# Altium PCB pyBehaviorLab_breakout_board.PcbDoc (part 2 of 4)
Units mm, origin at the board's own origin, x right, y up, seen from the top; angles counter-clockwise.
Board outline 190.01 x 159.89 mm, 2 copper layers (Top Layer, Bottom Layer); 146 components, 148 nets, 758 pads, 634 vias.
Unrouted connection lines stored in the file: 29.
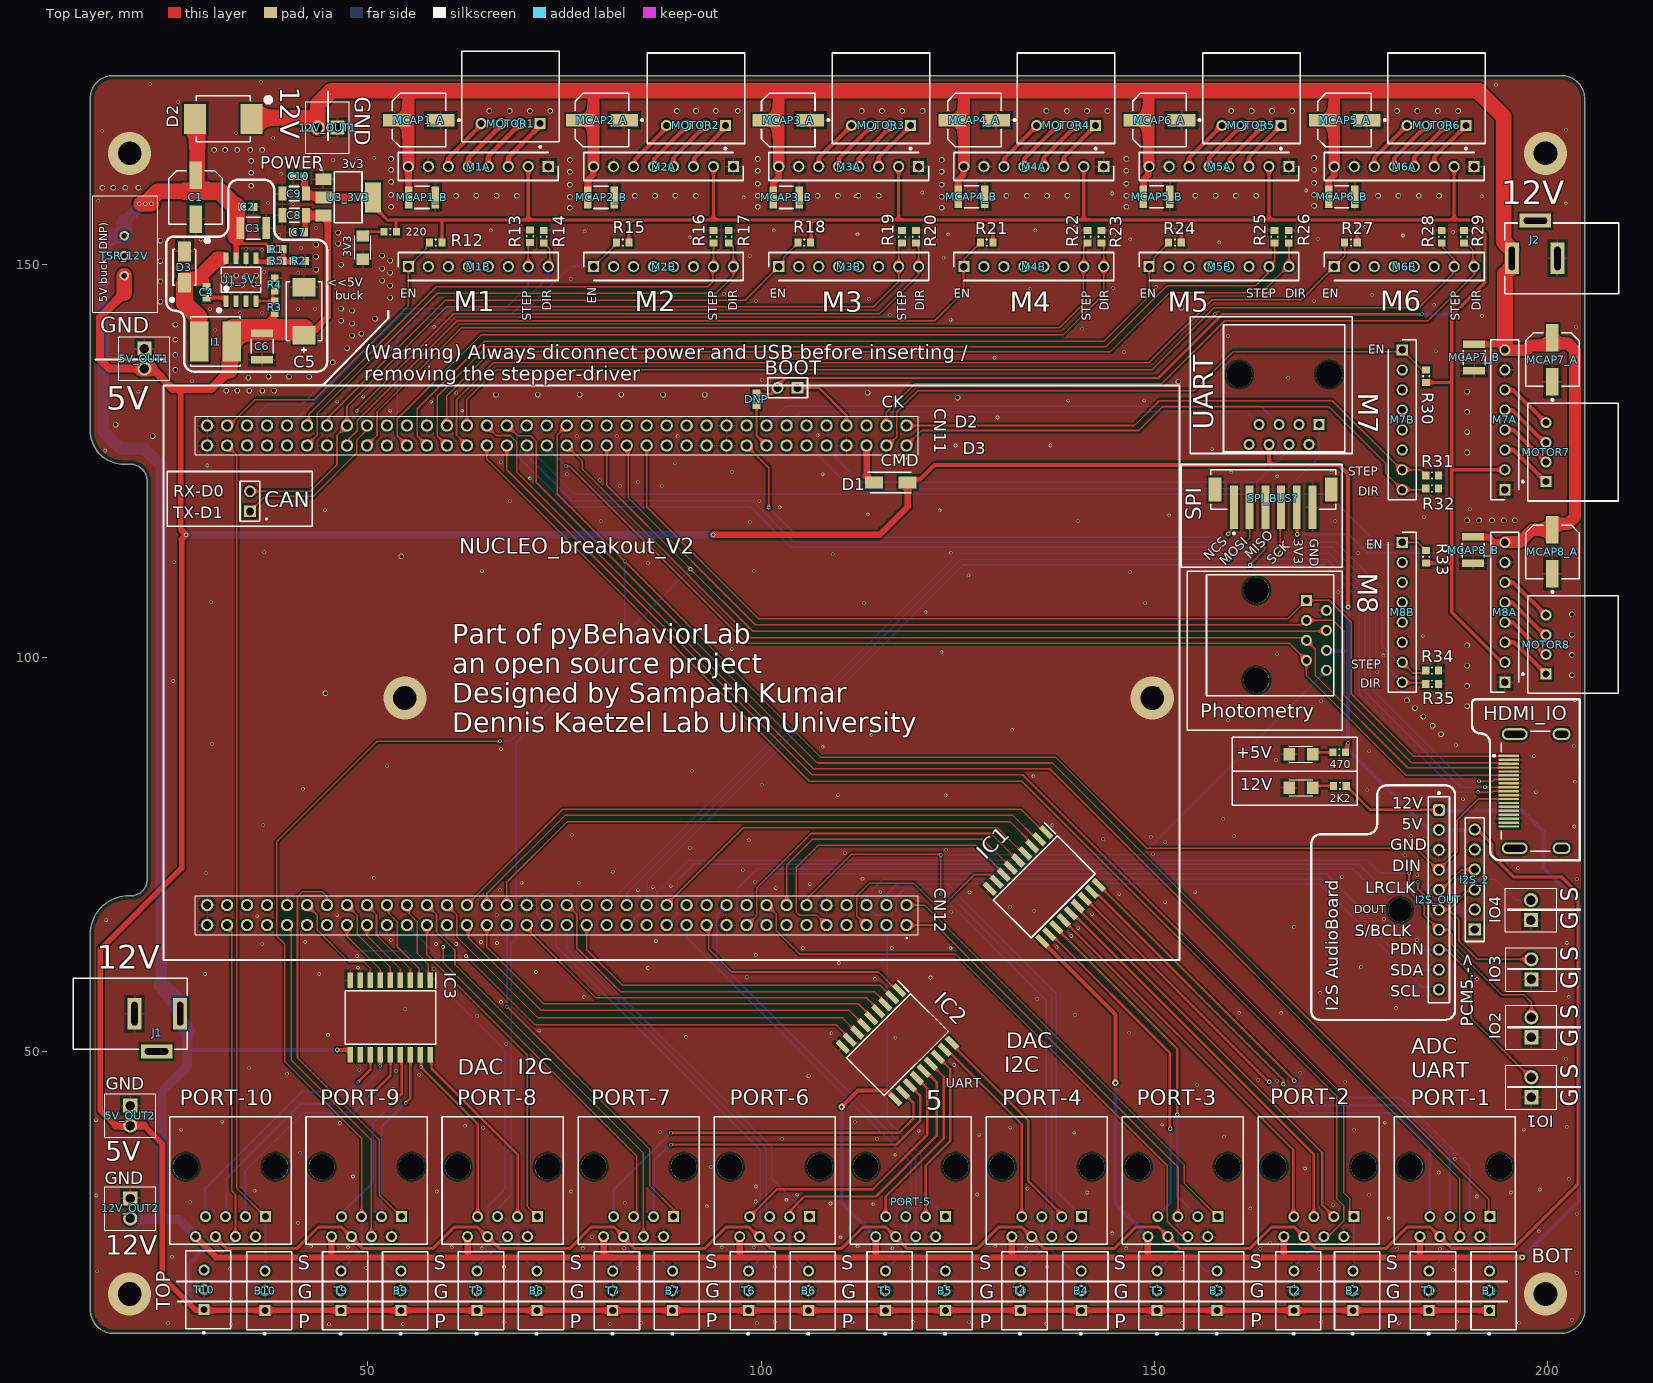
[diagram p0: Top Layer view]

## Via types
v1: diameter 0.45, hole 0.3, Top Layer to Bottom Layer, tented both sides, 413 vias
v2: diameter 0.7, hole 0.5, Top Layer to Bottom Layer, tented bottom, 173 vias
v3: diameter 0.6, hole 0.3, Top Layer to Bottom Layer, tented both sides, 12 vias
v4: diameter 0.5, hole 0.3, Top Layer to Bottom Layer, tented both sides, 10 vias
v5: diameter 0.5, hole 0.35, Top Layer to Bottom Layer, tented both sides, 7 vias
v6: diameter 5.5, hole 3, Top Layer to Bottom Layer, tented bottom, 6 vias
v7: diameter 0.6, hole 0.305, Top Layer to Bottom Layer, tented both sides, 6 vias
v8: diameter 0.8, hole 0.4, Top Layer to Bottom Layer, tented both sides, 2 vias
v9: diameter 0.45, hole 0.305, Top Layer to Bottom Layer, tented both sides, 2 vias
v10: diameter 0.7, hole 0.3, Top Layer to Bottom Layer, tented both sides, 1 vias
v11: diameter 0.4, hole 0.3, Top Layer to Bottom Layer, tented both sides, 1 vias
v12: diameter 3, hole 3, Top Layer to Bottom Layer, tented both sides, 1 vias

## Nets (pads, with @x,y where several pads share a name; then routed paths per layer and width w, separated by ;. In a path a pad name is that pad's centre, name@x,y a point inside that pad or via, vN(x,y) a via of type N, cw(c..) or ccw(c..) an arc to the next point about the centre after c; other vN are vias at no path point) (continued)
+12V: (continued)
  Bottom Layer w0.5: 27.305,50.128 v3@46.064,50.128 ; v8(110.236,42.926) 110.236,30.759 PORT-5.8@114.572,26.423 ; v8(145.034,45.974) 145.034,30.55 PORT-3.8@149.161,26.423 ; I2S_OUT.1@186.164,80.68 186.232,80.611 196.757,80.611 199.449,77.919 199.449,73.32 203.95,68.819 203.95,30.992 v10(196.742,23.784)
  Bottom Layer w1: 12V_OUT2.2@19.794,28.737 12V_OUT2.2@19.925,28.605 ; 23.802,28.747 23.944,28.605 ; J1.1@25.744,56.351 25.744,55.172 J1.1@26.144,54.772 J1.1@26.144,53.672
  Bottom Layer w1.2: 12V_OUT2.2@19.925,28.605 23.944,28.605 25.991,28.605 PORT-10.8@28.136,26.46 ; 23.802,28.747 23.802,44.806 27.068,48.073 27.068,52.747
  Bottom Layer w1.5: 17.807,153.67 16.375,152.238 16.375,128.769 18.536,126.608 21.609,126.608 23.731,124.485 23.731,58.364 ; 19.05,155.448 20.955,157.353 v3(20.955,157.734)
  Bottom Layer w2: 17.807,153.67 TSR_12V.1@19.05,153.67 19.05,155.448 ; v3@21.209,157.734 v3(21.717,157.734) v3@21.844,157.734 ; 23.731,58.364 J1.1@25.744,56.351 ; J1.1@26.144,53.672 27.068,52.747
+12V_motor: 12V_OUT1.2 D2.1 J2.1 M1A.8 M2A.8 M3A.8 M4A.8 M5A.8 M6A.8 M7A.8 M8A.8 MCAP1_A.2 MCAP1_B.1 MCAP2_A.2 MCAP2_B.1 MCAP3_A.2 MCAP3_B.1 MCAP4_A.2 MCAP4_B.1 MCAP5_A.2 MCAP5_B.1 MCAP6_A.2 MCAP6_B.1 MCAP7_A.2 MCAP7_B.1 MCAP8_A.2 MCAP8_B.1 | length 328.7
  Top Layer w0.8: MCAP1_B.1@55.158,157.895 M1A.8@55.158,162.467 ; MCAP2_B.1@77.981,158.531 77.981,160.761 78.641,161.421 78.641,162.408 M2A.8@78.699,162.467 ; MCAP3_B.1@101.522,158.496 101.564,158.538 101.564,160.429 102.223,161.088 M3A.8@102.223,162.449 ; MCAP4_B.1@125.063,158.623 125.063,160.756 125.725,161.418 125.725,162.411 M4A.8@125.781,162.467 ; MCAP5_B.1@148.603,158.623 148.603,160.795 149.202,161.394 149.202,162.347 M5A.8@149.322,162.467 ; MCAP6_B.1@172.144,158.623 172.144,160.657 172.856,161.369 172.856,162.46 M6A.8@172.863,162.467 ; MCAP8_B.1@190.517,115.37 192.497,115.37 193.185,114.683 M8A.8@194.55,114.683 M8A.8@194.595,114.728 ; MCAP7_B.1@190.644,139.868 194.13,139.868 ; M7A.8@194.55,139.15 194.569,139.168 194.569,139.868
  Top Layer w1.5: D2.1@35.191,168.529 35.191,168.535 D2.1@35.838,169.182 ; 43.438,169.182 43.619,169 12V_OUT1.2@43.619,167.421 ; M1A.8@55.158,162.467 55.158,172.105 ; M2A.8@78.699,162.467 78.699,171.704 ; M3A.8@102.24,162.467 102.24,171.704 ; M4A.8@125.781,162.467 125.781,172.085 ; M5A.8@149.276,162.721 149.276,172.339 ; M6A.8@172.863,162.467 172.863,171.688 ; M8A.8@194.595,114.728 196.463,114.728 198.02,116.285 MCAP8_A.2@200.584,116.285 200.584,116.978 200.634,117.028 202.573,117.028 203.452,117.907 203.452,139.089 202.573,139.968 200.634,139.968 MCAP7_A.2@200.584,140.018 ; M7A.8@194.603,139.097 197.181,139.097 197.796,139.711 200.534,139.711 200.584,139.761 MCAP7_A.2@200.584,140.018 ; J2.1@195.285,149.534 195.285,151.734 J2.1@195.435,151.884 ; MCAP7_A.2@200.584,140.711 MCAP7_A.2@200.584,140.018
  Top Layer w2: D2.1@35.838,168.674 43.438,168.674 ; 12V_OUT1.2@43.619,167.421 43.619,170.365 45.359,172.105 55.158,172.105 191.247,172.105 ; 191.234,171.986 194.41,168.81 194.41,152.908 J2.1@195.435,151.884 ; 194.569,139.868 194.569,148.817 J2.1@195.285,149.534
\: B8.3 CN11.32 Photometry.4 PORT-8.5 | length 206.2
  Top Layer w0.2: CN11.32@80.373,127 80.373,121.935 v4(91.022,111.287) 98.93,103.378 Photometry.4@171.974,103.378
  Bottom Layer w0.2: B8.3@71.492,22.038 69.178,24.352 69.178,26.928 67.328,28.778 66.683,28.778 PORT-8.5@66.498,28.963 66.539,29.003 66.539,29.963 68.249,31.673 68.249,63.677 68.888,64.316 68.888,69.083 68.885,69.086 68.885,89.198 90.974,111.287 v4(91.022,111.287)
BOOT0: BOOT.1 CN11.7 | length 9
  Top Layer w0.3: BOOT.1@104.626,134.331 107.35,134.331 110.853,130.828 CN11.7@110.853,129.54